# Altium PCB PCB1.PcbDoc (part 1 of 3)
Units mil, origin at the board's own origin, x right, y up, seen from the top; angles counter-clockwise.
Board outline 3150 x 1810 mil, 2 copper layers (Top Layer, Bottom Layer); 127 components, 76 nets, 410 pads, 265 vias.
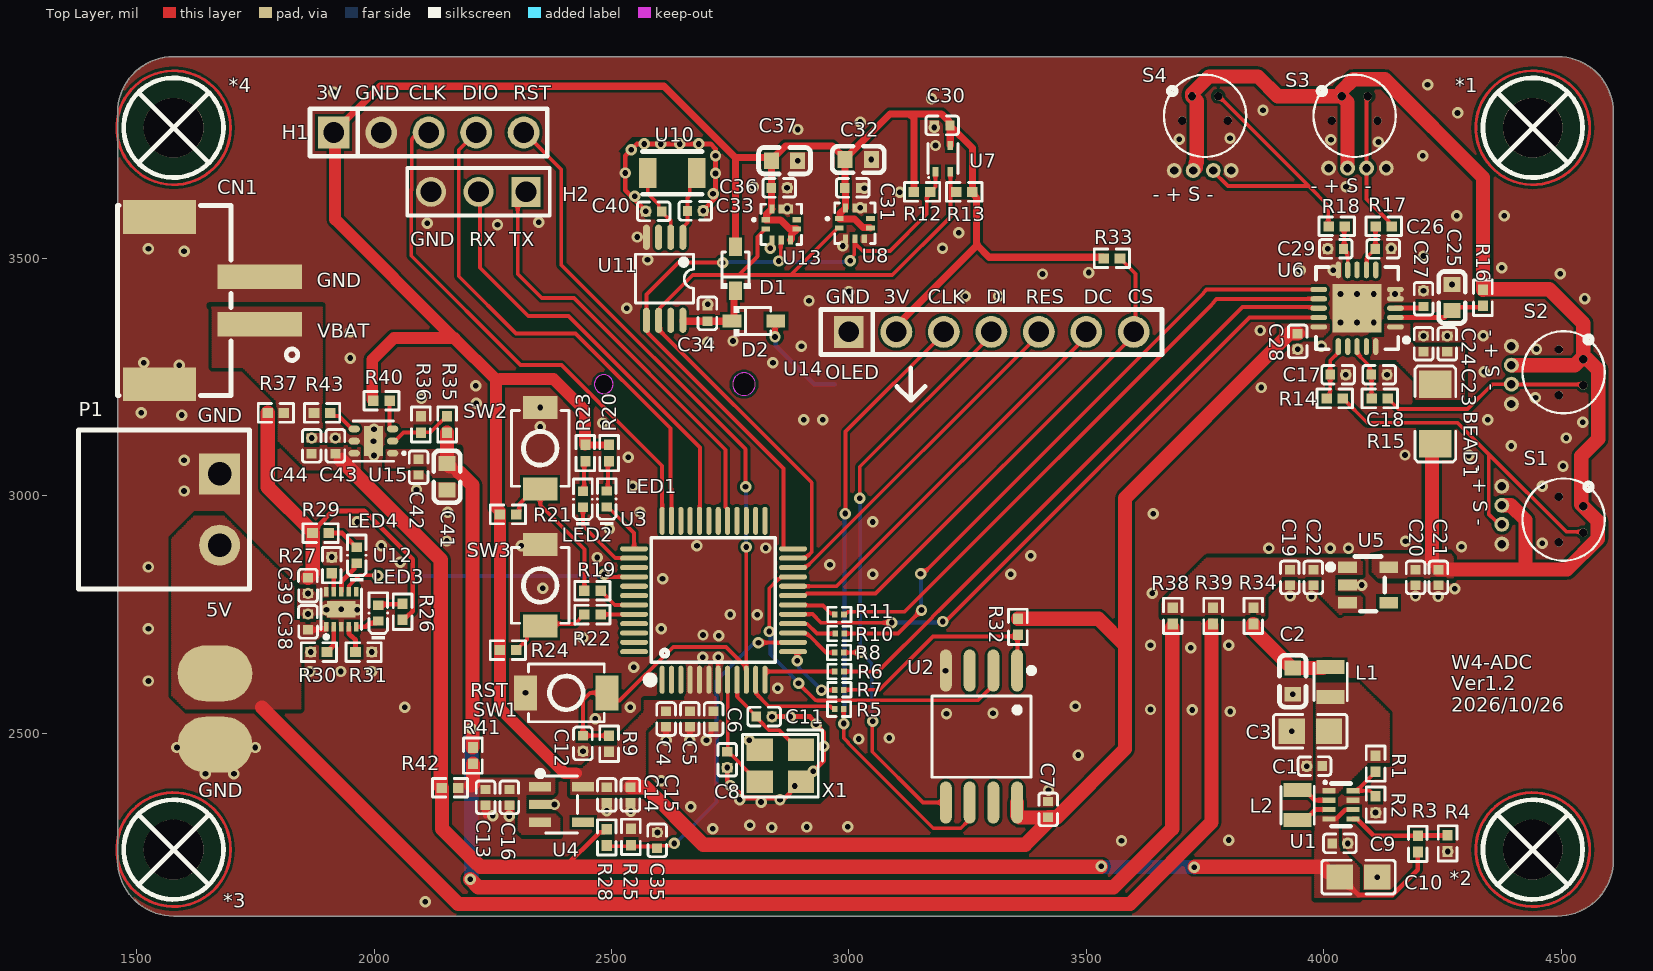
[diagram p0: Top Layer view]
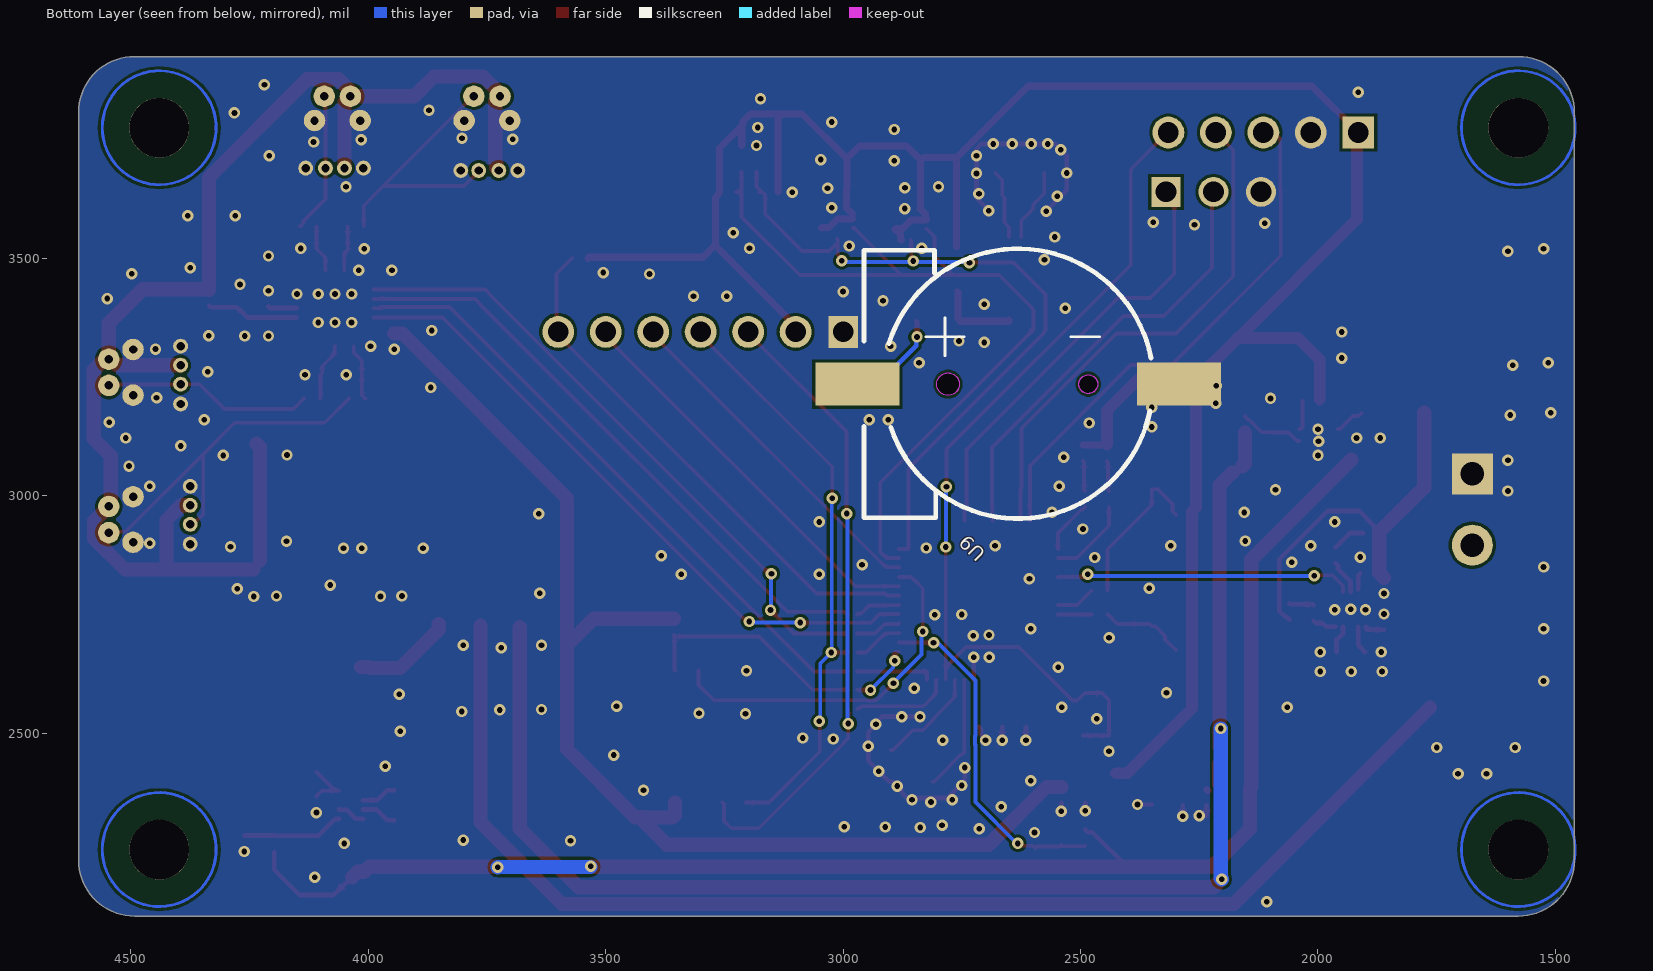
[diagram p1: Bottom Layer view, seen from below]

## Layer stack, top to bottom
Top Solder: solder mask 0.4, Solder Resist, Dk 3.5
Top Layer: signal copper 1.4
Dielectric 1: dielectric 12.6, FR-4, Dk 4.8
Bottom Layer: signal copper 1.4
Bottom Solder: solder mask 0.4, Solder Resist, Dk 3.5

## Board outline
1460,2233.11 1460,3806.89 cw(c1578.11,3806.89) 1578.11,3925 4491.89,3925 cw(c4491.89,3806.89) 4610,3806.89 4610,2233.11 cw(c4491.89,2233.11) 4491.89,2115 1578.11,2115 cw(c1578.11,2233.11)

## Design rules (kind name [scope] priority, off if disabled: settings)
Clearance [All] p1: gap=6 ignorepadtopadclearanceinfootprint=FALSE except(4: Arc-Arc Arc-Track Track-Track; 6.9: Arc-Hole Track-Hole SMDPad-Hole THPad-Hole Via-Hole Fill-Hole Poly-Hole Region-Hole Text-Hole; 10: Fill-Text Poly-Text Region-Text)
ComponentClearance [All] p1: gap=0 collisioncheckmode=3 verticalgap=0 showdistances=FALSE
HoleSize [All] p1: absolutevalues=TRUE maxlimit=130 minlimit=1 maxpercent=80.000 minpercent=20.000
MinimumSolderMaskSliver [All] p1: minsoldermaskwidth=3
PlaneConnect [All] p1: planeconnectstyle=Direct reliefexpansion=20 reliefentries=4 reliefconductorwidth=10 reliefairgap=10
PolygonConnect [All] p1: connectstyle=Direct reliefconductorwidth=10 reliefentries=4 polygonreliefangle="90 Angle" airgapwidth=10
RoutingVias [All] p1: holewidth=28 width=50 viastyle="Through Hole" minholewidth=28 minwidth=50 maxholewidth=28 maxwidth=50
SilkToSilkClearance [All] p1: silktosilkclearance=2
SilkToSolderMaskClearance [IsPad] p1: minsilkscreentomaskgap=2 clearancetoexposedcopper=TRUE
SolderMaskExpansion [All] p1: expansion=0 istentingtop=FALSE
SupplyNets "Schematic Supply Nets_5" [InNet('5.5V')] p1: voltage=0.000
SupplyNets "Schematic Supply Nets_2" [InNet('5V_BOOST')] p2: voltage=0.000
SupplyNets "Schematic Supply Nets_4" [InNet('5V_IN')] p3: voltage=0.000
SupplyNets "Schematic Supply Nets" [InNet('VBAT')] p4: voltage=0.000
SupplyNets "Schematic Supply Nets_3" [InNet('3V')] p5: voltage=0.000
SupplyNets "Schematic Supply Nets_1" [InNet('5V')] p6: voltage=0.000
SupplyNets "Schematic Supply Nets_8" [InNet('GND')] p7: voltage=0.000
Width [All] p1: maxlimit=50 minlimit=6 preferedwidth=10 minimp=50.000000 maximp=50.000000 favimp=50.000000
24 further rules are at their usual default settings.

## Components (designator, comment, footprint, x,y, rotation, side; value= is the part's Value field where it differs from the comment)
*1 "螺丝孔_1" M3螺丝 4440,3775 r0 top
*2 "螺丝孔_1" M3螺丝 4440,2255 r0 top
*3 "螺丝孔_1" M3螺丝 1578,2255 r0 top
*4 "螺丝孔_1" M3螺丝 1578,3775 r0 top
BEAD1 "cbm321609u000t" L1206 4235,3172.3 r90 top
C1 "cc0402krx7r7bb104" C0402 3980.43,2430.71 r180 top value=100nF
C2 "hgc0603r5225k500nthj" C0603 3934.72,2609.68 r90 top value=2.2uF
C3 "cga0805x5r226m250mt" C0805 3971.63,2504.15 r180 top value=22uF
C4 "cc0402krx7r7bb104" C0402 2615,2530 r270 top value=100nF
C5 "cc0402krx7r7bb104" C0402 2665,2530 r270 top value=100nF
C6 "cc0402krx7r7bb104" C0402 2715,2530 r270 top value=100nF
C7 "cc0402krx7r7bb104" C0402 3419.65,2339.64 r90 top value=100nF
C8 "cc0402jrnpo9bn180" C0402 2743.78,2444.2 r270 top value=18pF
C9 "cc0402krx7r7bb104" C0402 4034,2268 r180 top value=100nF
C10 "cl21a476mqynnne" C0805 4073,2197 r180 top value=47uF
C11 "cc0402jrnpo9bn180" C0402 2821.54,2535 r180 top value=18pF
C12 "cc0402krx7r7bb104" C0402 2440,2478.46 r90 top value=100nF
C13 "cga0402x5r105k500gt" C0402 2235,2365 r270 top value=1uF
C14 "cc0402krx7r7bb104" C0402 2490,2370 r270 top value=100nF
C15 "cga0402x5r105k500gt" C0402 2540,2370 r270 top value=1uF
C16 "cc0402krx7r7bb104" C0402 2285,2365 r270 top value=100nF
C17 "cc0402jrnpo9bn101" C0402 4030,3255 r0 top value=100pF
C18 "cc0402jrnpo9bn101" C0402 4116.54,3255 r0 top value=100pF
C19 "cga0402x5r105k500gt" C0402 3928.52,2827.99 r270 top value=1uF
C20 "cc0402krx7r7bb104" C0402 4193.31,2827.99 r270 top value=100nF
C21 "cga0402x5r105k500gt" C0402 4241.31,2827.99 r270 top value=1uF
C22 "cc0402krx7r7bb104" C0402 3978.01,2827.99 r270 top value=100nF
C23 "cga0402x5r105k500gt" C0402 4260,3320 r90 top value=1uF
C24 "cc0402krx7r7bb104" C0402 4210,3320 r90 top value=100nF
C25 "hgc0603r5106m350nthj" C0603 4270,3417.56 r90 top value=10uF
C26 "cc0402jrnpo9bn101" C0402 4125,3520 r0 top value=100pF
C27 "cc0402krx7r7bb104" C0402 4210,3415 r90 top value=100nF
C28 "cc0402krx7r7bb104" C0402 3945,3325 r90 top value=100nF
C29 "cc0402jrnpo9bn101" C0402 4025,3520 r180 top value=100pF
C30 "cc0402krx7r7bb104" C0402 3196.46,3780 r180 top value=100nF
C31 "cc0402krx7r7bb104" C0402 3007.94,3648.43 r0 top value=100nF
C32 "hgc0603r5106m350nthj" C0603 3019.68,3707.99 r0 top value=10uF
C33 "cga0402c0g120j500gt" C0402 2676.54,3600 r0 top value=12pF
C34 "cc0402krx7r7bb104" C0402 2702,3384 r90 top value=100nF
C35 "cc0402krx7r7bb104" C0402 2596.23,2274.46 r270 top value=100nF
C36 "cc0402krx7r7bb104" C0402 2853.27,3648.43 r0 top value=100nF
C37 "hgc0603r5106m350nthj" C0603 2864.53,3705.69 r0 top value=10uF
C38 "cga0402x5r105k500gt" C0402 1861,2734.58 r270 top value=1uF
C39 "cga0402x5r105k500gt" C0402 1861,2810.9 r90 top value=1uF
C40 "cga0402c0g120j500gt" C0402 2589,3599 r0 top value=12pF
C41 "hgc0603r5225k500nthj" C0603 2153.76,3040.17 r270 top value=2.2uF
C42 "cc0402krx7r7bb104" C0402 2093.76,3060.17 r270 top value=100nF
C43 "cc0402krx7r7bb104" C0402 1918.76,3105.17 r270 top value=100nF
C44 "cga0402x5r105k500gt" C0402 1868.76,3105.17 r270 top value=1uF
CN1 "2.54-2a-lt" CONN-SMD_2P-P2.54_XH2.54-2AB 1653.95,3411.23 r90 top
D1 "1n5819ws_c191023" SOD-323_L1.8-W1.3-LS2.5-RD 2761.32,3478.16 r90 top
D2 "1n5819ws_c191023" SOD-323_L1.8-W1.3-LS2.5-RD 2800,3368 r0 top
H1 "pz254v-11-05p" HDR-TH_5P-P2.54-V-M 2115,3765 r0 top
H2 "lail-pz2.54-3p-l" HDR-TH_3P-P2.54-V-M-1 2220,3640 r180 top
L1 "pct201210-1r0-m" IND-SMD_L2.0-W1.2_PCT201210 4014.5,2608 r270 top value=1uH
L2 "pct201210-1r0-m" IND-SMD_L2.0-W1.2_PCT201210 3945,2348.5 r90 top value=1uH
LED1 "xl-1005ugc_c965793" LED0402-RD_GREEN 2490,2993.27 r90 top
LED2 "xl-1005ugc_c965793" LED0402-RD_GREEN 2439.96,2992.76 r90 top
LED3 "xl-1005ugc_c965793" LED0402-RD_GREEN 2009,2753 r90 top
LED4 "xl-1005ugc_c965793" LED0402-RD_GREEN 1963.55,2874.73 r90 top
P1 "wj15edgrc-3.81-02p-14-00a" CONN-TH_2P-P3.81_WJ15EDGRC-3.81-2P 1675,2971 r270 top
R1 "0402wgf8663tce" R0402 4109,2436 r270 top value=866kΩ
R2 "rt0402brd0791kl" R0402 4109,2349.96 r270 top value=91kΩ
R3 "frc0402f0000ts" R0402 4198,2267 r90 top value=0Ω
R4 "frc0402f1003ts" R0402 4260.74,2268 r270 top value=100kΩ
R5 "0201wmf470jtee" R0201 2979.51,2550.86 r180 top value=47Ω
R6 "0201wmf470jtee" R0201 2980,2630 r180 top value=47Ω
R7 "0201wmf470jtee" R0201 2979.84,2591.48 r180 top value=47Ω
R8 "0201wmf470jtee" R0201 2979.51,2670 r180 top value=47Ω
R9 "frc0402f1002ts" R0402 2495,2477.96 r270 top value=10kΩ
R10 "0201wmf470jtee" R0201 2980.49,2710 r180 top value=47Ω
R11 "0201wmf470jtee" R0201 2980,2750 r180 top value=47Ω
R12 "rc0402fr-074k7l" R0402 3154,3640 r0 top value=4.7kΩ
R13 "rc0402fr-074k7l" R0402 3243,3640 r180 top value=4.7kΩ
R14 "frc0402f1000ts" R0402 4022.96,3205 r180 top value=100Ω
R15 "frc0402f1000ts" R0402 4117.96,3205 r180 top value=100Ω
R16 "frc0402f0000ts" R0402 4335,3417.04 r90 top value=0Ω
R17 "frc0402f1000ts" R0402 4126.31,3567.39 r180 top value=100Ω
R18 "frc0402f1000ts" R0402 4027.23,3567.39 r0 top value=100Ω
R19 "0402wgf4700tce" R0402 2460,2800 r0 top value=470Ω
R20 "frc0402j102 ts" R0402 2495,3090 r90 top value=1kΩ
R21 "rc0402fr-074k7l" R0402 2282.04,2960.67 r0 top value=4.7kΩ
R22 "0402wgf4700tce" R0402 2460,2750 r0 top value=470Ω
R23 "frc0402j102 ts" R0402 2445,3090 r90 top value=1kΩ
R24 "rc0402fr-074k7l" R0402 2282.04,2675 r0 top value=4.7kΩ
R25 "0402wgf4702tce" R0402 2541.06,2281.56 r270 top value=47kΩ
R26 "frc0402f1501ts" R0402 2060,2755.96 r270 top value=1.5kΩ
R27 "frc0402f1002ts" R0402 1911,2853.96 r90 top value=10kΩ
R28 "frc0402f1003ts" R0402 2490.04,2280.71 r90 top value=100kΩ
R29 "frc0402f1501ts" R0402 1887.47,2921.58 r180 top value=1.5kΩ
R30 "frc0402f5900ts" R0402 1883.96,2671 r0 top value=590Ω
R31 "frc0402f2001ts" R0402 1978.04,2671 r180 top value=2kΩ
R32 "frc0402f1002ts" R0402 3356,2724 r90 top value=10kΩ
R33 "frc0402f1002ts" R0402 3553.89,3500.06 r0 top value=10kΩ
R34 "frc0402f0000ts" R0402 3851.59,2747.04 r270 top value=0Ω
R35 "frc0402f3482ts" R0402 2153.76,3150.17 r270 top value=34.8kΩ
R36 "frc0402f1002ts" R0402 2098.76,3150.17 r270 top value=10kΩ
R37 "frc0402f0000ts" R0402 1793.32,3174.64 r0 top value=0Ω
R38 "frc0402f0000ts" R0402 3681.87,2747.04 r270 top value=0Ω
R39 "frc0402f0000ts" R0402 3766.73,2747.04 r270 top value=0Ω
R40 "frc0402f1002ts" R0402 2015.8,3200.17 r0 top value=10kΩ
R41 "frc0402f0000ts" R0402 2208.19,2452.97 r270 top value=0Ω
R42 "frc0402f0000ts" R0402 2160,2385 r0 top value=0Ω
R43 "frc0402f0000ts" R0402 1890.72,3174.64 r0 top value=0Ω
S1 "PressureSensor" PressureSensor 4505,2950 r270 top
S2 "PressureSensor" PressureSensor 4505,3260 r270 top
S3 "PressureSensor" PressureSensor 4065,3800 r0 top
S4 "PressureSensor" PressureSensor 3750,3800 r0 top
SW1 "ts-1088-ar02016" SW-SMD_L3.9-W3.0-P4.45 2405,2585 r0 top
SW2 "ts-1088-ar02016" SW-SMD_L3.9-W3.0-P4.45 2350,3100 r270 top
SW3 "ts-1088-ar02016" SW-SMD_L3.9-W3.0-P4.45 2350,2811.34 r270 top
U1 "tps631000drlr" SOT-583-8_L2.1-W1.2-P0.50-LS1.6-BL 4036.2,2349.16 r270 top
U2 "w25q128jvsiq" SOIC-8_L5.3-W5.3-P1.27-LS8.0-BL 3279.21,2493.06 r180 top
U3 "stm32g031c8t6" LQFP-48_L7.0-W7.0-P0.50-LS9.0-BL 2715,2780 r0 top
U4 "lp5907mfx-3.0/nopb" SOT-23-5_L3.0-W1.7-P0.95-LS2.8-BL 2395,2350 r270 top
U5 "tps7a2050pdbvr" SOT-23-5_L2.9-W1.6-P0.95-LS2.8-BR 4093.31,2811.99 r180 top
U6 "ad7682bcpz" LFCSP-20_L4.0-W4.0-P0.50-BL-EP 4070,3395 r90 top
U7 "sht41-ad1b-r2" DFN-4_L1.5-W1.5-SHT41-AD1B-R2 3198,3710 r90 top
U8 "lps22hbtr" HLGA-10L_LPS22HBTR 3012.61,3573.64 r0 top
U9 "xdcr-1220-006" BAT-SMD_CR1220-2ZX 2631.42,3235 r180 bottom
U10 "fc31m2-32.768-ntlnndtl" CRYSTAL-SMD_L3.2-W1.5 2628,3680 r0 top value=32.768kHz
U11 "pcf8563ts/5,118" TSSOP-8_L3.0-W3.0-P0.65-LS4.9-BL 2612,3457 r180 top
U12 "bq24040dsqr" WSON-10_L2.0-W2.0-P0.40-BL-EP 1931,2761 r0 top
U13 "lps22hbtr" HLGA-10L_LPS22HBTR 2857.46,3571.34 r0 top
U14 "kh-2.54fh-1x7p-h8.5" HDR-TH_7P-P2.54-V-F 3300,3345 r0 top
U15 "tps7a2501drvr" WSON-6_L2.0-W2.0-P0.65-TL-EP 1998.76,3115.17 r180 top
X1 "x32258mob4si" CRYSTAL-SMD_4P-L3.2-W2.5-BL 2855.61,2431.46 r180 top value=8MHz

## Footprints (in the part's own frame and the unit in brackets; to place one, negate y for a bottom-side part, rotate by r counter-clockwise, add the part's x,y. Pads: shape width x height; smd on the part's side, far side on the other; paste and mask are expansions set on the pad)
BAT-SMD_CR1220-2ZX [mm]
  rect 4.5x2.3 smd: 1(-8.6,0) 2(8.6,0)
  Keep-Out Layer board cut-out: 4.25,0 4.25,-0.099 4.174,-0.283 4.033,-0.424 3.85,-0.5 3.651,-0.5 3.467,-0.424 3.326,-0.283 3.25,-0.099 3.25,0 3.25,0.099 3.326,0.283 3.467,0.424 3.651,0.5 3.85,0.5 4.033,0.424 4.174,0.283 4.25,0.099 4.25,0 4.25,0
  Keep-Out Layer board cut-out: -3.15,0 -3.15,-0.119 -3.241,-0.34 -3.41,-0.509 -3.631,-0.6 -3.869,-0.6 -4.09,-0.509 -4.259,-0.34 -4.35,-0.119 -4.35,0 -4.35,0.119 -4.259,0.34 -4.09,0.509 -3.869,0.6 -3.631,0.6 -3.41,0.509 -3.241,0.34 -3.15,0.119 -3.15,0 -3.15,0
  Keep-Out Layer circle w0.003: c3.75,0 r0.5
  Keep-Out Layer circle w0.003: c-3.75,0 r0.6
  Keep-Out Layer region: 4.25,0 4.25,-0.099 4.174,-0.283 4.033,-0.424 3.85,-0.5 3.651,-0.5 3.467,-0.424 3.326,-0.283 3.25,-0.099 3.25,0 3.25,0.099 3.326,0.283 3.467,0.424 3.651,0.5 3.85,0.5 4.033,0.424 4.174,0.283 4.25,0.099 4.25,0 4.25,0
  Keep-Out Layer region: 4.25,0 4.24,-0.098 4.212,-0.191 4.166,-0.278 4.104,-0.354 4.028,-0.416 3.941,-0.462 3.848,-0.49 3.75,-0.5 3.653,-0.49 3.559,-0.462 3.472,-0.416 3.397,-0.354 3.334,-0.278 3.288,-0.191 3.26,-0.098 3.25,0 3.26,0.098 3.288,0.191 3.334,0.278 3.397,0.354 3.472,0.416 3.559,0.462 3.653,0.49 3.75,0.5 3.848,0.49 3.941,0.462 4.028,0.416 4.104,0.354 4.166,0.278 4.212,0.191 4.24,0.098 4.25,0
  Keep-Out Layer region: -3.15,0 -3.15,-0.119 -3.241,-0.34 -3.41,-0.509 -3.631,-0.6 -3.869,-0.6 -4.09,-0.509 -4.259,-0.34 -4.35,-0.119 -4.35,0 -4.35,0.119 -4.259,0.34 -4.09,0.509 -3.869,0.6 -3.631,0.6 -3.41,0.509 -3.241,0.34 -3.15,0.119 -3.15,0 -3.15,0
  Keep-Out Layer region: -3.15,0 -3.159,-0.104 -3.186,-0.205 -3.23,-0.3 -3.29,-0.386 -3.364,-0.46 -3.45,-0.52 -3.545,-0.564 -3.646,-0.591 -3.75,-0.6 -3.854,-0.591 -3.955,-0.564 -4.05,-0.52 -4.136,-0.46 -4.21,-0.386 -4.27,-0.3 -4.314,-0.205 -4.341,-0.104 -4.35,0 -4.341,0.104 -4.314,0.205 -4.27,0.3 -4.21,0.386 -4.136,0.46 -4.05,0.52 -3.955,0.564 -3.854,0.591 -3.75,0.6 -3.646,0.591 -3.545,0.564 -3.45,0.52 -3.364,0.46 -3.29,0.386 -3.23,0.3 -3.186,0.205 -3.159,0.104 -3.15,0
  silkscreen extent -8.24,-7.19 7.11,7.24
C0402 [mm]
  rect 0.5x0.54 smd: 1(-0.42,0) 2(0.42,0)
  silkscreen extent -0.87,-0.5 0.87,0.5
C0603 [mm]
  rect 0.8x0.9 smd: 1(-0.7,0) 2(0.7,0)
  silkscreen extent -1.39,-0.71 1.39,0.71
C0805 [mm]
  rect 1.41x1.35 smd paste-100 mask+0.051: 1(-1,0) 2(1,0)
  silkscreen extent -1.96,-0.9 1.96,0.9
CONN-SMD_2P-P2.54_XH2.54-2AB [mm]
  rect 1.3x4.5 smd: 1(-1.269,-2.675) 2(1.27,-2.675)
  rect 1.8x3.9 smd: 3(-4.47,2.675) 4(4.47,2.675)
  silkscreen extent -5.08,-4.71 5.08,4.93
CONN-TH_2P-P3.81_WJ15EDGRC-3.81-2P [mm]
  rect 2.2x2.2 hole 1.26: 1(-1.905,0)
  round 2.2 hole 1.26: 2(1.905,0)
  silkscreen extent -4.25,-7.55 4.25,1.6
CRYSTAL-SMD_4P-L3.2-W2.5-BL [mm]
  rect 1.4x1.2 smd: 1(-1.1,-0.85) 2(1.1,-0.85) 3(1.1,0.85) 4(-1.1,0.85)
  silkscreen extent -2.26,-1.91 2.03,1.68
CRYSTAL-SMD_L3.2-W1.5 [mm]
  rect 0.95x1.6 smd: 1(-1.308,0) 2(1.308,0)
  silkscreen extent -1.6,-1.14 1.6,1.14
DFN-4_L1.5-W1.5-SHT41-AD1B-R2 [mm]
  rect 0.5x0.3 smd paste+0 mask+0.051: 1(-0.7,0.4) 2(-0.7,-0.4) 3(0.7,-0.4) 4(0.7,0.4)
  silkscreen extent -1.05,-0.8 0.8,0.8
HDR-TH_3P-P2.54-V-M-1 [mm]
  rect 1.575x1.6 hole 1.1 paste-2539.97 mask+0.05: 1(-2.54,0)
  round 1.6 hole 1.1 paste-2539.97 mask+0.05: 2(0,0) 3(2.54,0)
  silkscreen extent -3.81,-1.27 3.81,1.27
HDR-TH_5P-P2.54-V-M [mm]
  rect 1.7x1.7 hole 1.1: 1(-5.08,0)
  round 1.7 hole 1.1: 2(-2.54,0) 3(0,0) 4(2.54,0) 5(5.08,0)
  silkscreen extent -6.35,-1.27 6.35,1.27
HDR-TH_7P-P2.54-V-F [mm]
  rect 1.575x1.7 hole 1.1: 1(-7.62,0)
  round 1.7 hole 1.1: 2(-5.08,0) 3(-2.54,0) 4(0,0) 5(2.54,0) 6(5.08,0) 7(7.62,0)
  silkscreen extent -9.13,-1.2 9.13,1.2
HLGA-10L_LPS22HBTR [mm]
  rect 0.465x0.28 smd: 1(-0.832,0.255) 2(-0.832,-0.245) 6(0.832,-0.245) 7(0.832,0.255)
  rect 0.28x0.465 smd: 3(-0.5,-0.827) 4(0,-0.827) 5(0.5,-0.827) 8(0.5,0.827) 9(0,0.827) 10(-0.5,0.827)
  silkscreen extent -1.54,-1.07 1.08,1.08
IND-SMD_L2.0-W1.2_PCT201210 [mm]
  rect 0.75x1.5 smd: 1(-0.8,0) 2(0.8,0)
  silkscreen extent -1,-0.89 1,0.89
L1206 [mm]
  rect 1.485x1.728 smd paste-100 mask+0.051: 1(-1.593,0) 2(1.593,0)
  silkscreen extent -2.56,-1.09 2.56,1.09
LED0402-RD_GREEN [mm]
  rect 0.5x0.54 smd paste+0 mask+0.051: 1(-0.425,0) 2(0.425,0)
  silkscreen extent -1.39,-0.54 1.09,0.54
LFCSP-20_L4.0-W4.0-P0.50-BL-EP [mm]
  oval 0.28x0.9 smd paste-100 mask+0.051: 1(-1,-2.05) 2(-0.5,-2.05) 3(0,-2.05) 4(0.5,-2.05) 5(1,-2.05) 11(1,2.05) 12(0.5,2.05) 13(0,2.05) 14(-0.5,2.05) 15(-1,2.05)
  oval 0.9x0.28 smd paste-100 mask+0.051: 6(2.05,-1) 7(2.05,-0.5) 8(2.05,0) 9(2.05,0.5) 10(2.05,1) 16(-2.05,1) 17(-2.05,0.5) 18(-2.05,0) 19(-2.05,-0.5) 20(-2.05,-1)
  rect 2.6x2.6 smd paste-100 mask+0.051: 21(0,0)
  silkscreen extent -2.2,-2.77 2.2,2.2
LQFP-48_L7.0-W7.0-P0.50-LS9.0-BL [mm]
  oval 0.27x1.5 smd paste+0 mask+0.05: 1(-2.75,-4.25) 2(-2.25,-4.25) 3(-1.75,-4.25) 4(-1.25,-4.25) 5(-0.75,-4.25) 6(-0.25,-4.25) 7(0.25,-4.25) 8(0.75,-4.25) 9(1.25,-4.25) 10(1.75,-4.25) 11(2.25,-4.25) 12(2.75,-4.25) 25(2.75,4.25) 26(2.25,4.25) 27(1.75,4.25) 28(1.25,4.25) 29(0.75,4.25) 30(0.25,4.25) 31(-0.25,4.25) 32(-0.75,4.25) 33(-1.25,4.25) 34(-1.75,4.25) 35(-2.25,4.25) 36(-2.75,4.25)
  oval 1.5x0.27 smd paste+0 mask+0.05: 13(4.25,-2.75) 14(4.25,-2.25) 15(4.25,-1.75) 16(4.25,-1.25) 17(4.25,-0.75) 18(4.25,-0.25) 19(4.25,0.25) 20(4.25,0.75) 21(4.25,1.25) 22(4.25,1.75) 23(4.25,2.25) 24(4.25,2.75) 37(-4.25,2.75) 38(-4.25,2.25) 39(-4.25,1.75) 40(-4.25,1.25) 41(-4.25,0.75) 42(-4.25,0.25) 43(-4.25,-0.25) 44(-4.25,-0.75) 45(-4.25,-1.25) 46(-4.25,-1.75) 47(-4.25,-2.25) 48(-4.25,-2.75)
  silkscreen extent -3.59,-4.46 3.3,3.34
M3螺丝 [mil]
  round 126 hole 126 paste-99999 mask+4: 1(0,0)
  silkscreen extent -105,-105 105,105
PressureSensor [mm]
  round 0.45 / inner round 1.15 / far side round 1.15 hole 0.45: 1(-0.7,1.05) 2(-1.22,-0.25) 3(1.22,-0.25) 4(0.7,1.05)
  silkscreen extent -2.2,-2.2 2.2,2.2
R0201 [mil]
  rect 11.93x12.76 smd paste-3937.01 mask+2: 1(-9.51,0) 2(9.51,0)
  silkscreen extent -24,-15 24,15
R0402 [mm]
  rect 0.566x0.54 smd paste-100 mask+0.051: 1(-0.433,0) 2(0.433,0)
  silkscreen extent -0.94,-0.5 0.94,0.5
SOD-323_L1.8-W1.3-LS2.5-RD [mm]
  rect 1x0.7 smd: 1(-1.172,0) 2(1.172,0)
  silkscreen extent -1.08,-0.8 0.9,0.8
SOIC-8_L5.3-W5.3-P1.27-LS8.0-BL [mm]
  oval 0.63x2.25 smd: 1(-1.905,-3.53) 2(-0.635,-3.53) 3(0.635,-3.53) 4(1.905,-3.53) 5(1.905,3.53) 6(0.635,3.53) 7(-0.635,3.53) 8(-1.905,3.53)
  silkscreen extent -2.82,-3.68 2.64,2.18
SOT-23-5_L2.9-W1.6-P0.95-LS2.8-BR [mm]
  rect 1x0.6 smd paste+0 mask+0.05: 1(1.1,-0.95) 2(1.1,0) 3(1.1,0.95) 4(-1.1,0.95) 5(-1.1,-0.95)
  silkscreen extent -0.89,-1.52 2.16,1.4
SOT-23-5_L3.0-W1.7-P0.95-LS2.8-BL [mm]
  rect 0.49x1.157 smd: 1(-0.95,-1.154) 2(0,-1.154) 3(0.95,-1.154)
  rect 0.49x1.175 smd: 4(0.95,1.154) 5(-0.95,1.154)
  silkscreen extent -1.8,-1.29 1.53,0.85
SOT-583-8_L2.1-W1.2-P0.50-LS1.6-BL [mm]
  rect 0.28x0.68 smd: 1(-0.75,-0.64) 2(-0.25,-0.64) 3(0.25,-0.64) 4(0.75,-0.64) 5(0.75,0.64) 6(0.25,0.64) 7(-0.25,0.64) 8(-0.75,0.64)
  silkscreen extent -1.27,-0.92 1.14,0.51
SW-SMD_L3.9-W3.0-P4.45 [mm]
  rect 1.23x1.86 smd: 1(-2.185,0) 2(2.185,0)
  silkscreen extent -2.03,-1.54 2.03,1.54
TSSOP-8_L3.0-W3.0-P0.65-LS4.9-BL [mm]
  oval 0.37x1.35 smd: 1(-0.975,-2.22) 2(-0.325,-2.22) 3(0.325,-2.22) 4(0.975,-2.22) 5(0.975,2.22) 6(0.325,2.22) 7(-0.325,2.22) 8(-0.975,2.22)
  silkscreen extent -1.55,-1.31 1.55,1.3
WSON-6_L2.0-W2.0-P0.65-TL-EP [mm]
  oval 0.607x0.364 smd: 1(-1.028,0.65) 2(-1.028,0) 3(-1.028,-0.65) 4(1.028,-0.65) 5(1.028,0) 6(1.028,0.65)
  rect 1x1.6 smd: 7(0,0)
  silkscreen extent -1.71,-1.08 1.08,1.08
WSON-10_L2.0-W2.0-P0.40-BL-EP [mm]
  rect 0.224x0.505 smd: 1(-0.8,-0.928) 2(-0.4,-0.928) 3(0,-0.928) 4(0.4,-0.928) 5(0.8,-0.928) 6(0.8,0.928) 7(0.4,0.928) 8(0,0.928) 9(-0.4,0.928) 10(-0.8,0.928)
  rect 1.5x0.9 smd: 11(0,0)
  silkscreen extent -1.08,-1.58 1.08,1.08

## Part data
BEAD1: "阻抗@频率:0Ω@100MHz;直流电阻(DCR):10mΩ;", Current Rating=6A, DC Resistance(DCR)=10mΩ, Impedance @ Frequency=0Ω@100MHz, JLCPCB Part Class="Extended Part", LCSC Part Name="单路 1206磁珠 阻抗0Ω@100MHz", Manufacturer=FH(风华), ManufacturerPart=CBM321609U000T, Operating Temperature=-55℃~+125℃, AddInBom=yes, ConvertToPcb=yes, Datasheet=https://item.szlcsc.com/datasheet/CBM321609U000T/367610.html, FootprintName=L1206, ModelId=85bdab7b3d4c4074b81d208eb5e865b3, ModelName=L1206_L3.2-W1.6-H1.1, ModelTransform=125.984,62.835,0,0,0,0,0,0,0, Number of Circuits=1, Supplier=LCSC, Supplier Footprint=1206, SupplierPart=C391206, Symbol=CBM321609U000T
C1 C4 C5 C6 C7 C9 C12 C14 C16 C20 C22 C24 C27 C28 C30 C31 C34 C35 C36 C42 C43: "容值:100nF;精度:±10%;额定电压:16V;温度系数:X7R;", JLCPCB Part Class="Extended Part", LCSC Part Name="100nF ±10% 16V", Manufacturer=YAGEO(国巨), ManufacturerPart=CC0402KRX7R7BB104, Temperature Coefficient=X7R, Tolerance=±10%, Voltage Rating=16V, AddInBom=yes, ConvertToPcb=yes, Datasheet=https://item.szlcsc.com/datasheet/CC0402KRX7R7BB104/61526.html, FootprintName=C0402, ModelId=36a51122f27c49738f86b3bfa98863e0, ModelName=C0402_L1.0-W0.5-H0.5, ModelTransform=39.37,19.685,0,0,0,0,0,0,0, Supplier=LCSC, Supplier Footprint=0402, SupplierPart=C60474, Symbol=CC0402KRX7R7BB104
C2 C41: "容值:2.2uF;精度:±10%;额定电压:50V;温度系数:X5R;", JLCPCB Part Class="Extended Part", LCSC Part Name="2.2uF ±10% 50V", Manufacturer=Chinocera(华瓷), ManufacturerPart=HGC0603R5225K500NTHJ, Temperature Coefficient=X5R, Tolerance=±10%, Voltage Rating=50V, AddInBom=yes, ConvertToPcb=yes, Datasheet=https://item.szlcsc.com/datasheet/HGC0603R5225K500NTHJ/8438251.html, FootprintName=C0603, ModelId=ac125912035d415993ca9572d50418b1, ModelName=C0603_L1.6-W0.8-H0.8, ModelTransform=62.992,31.496,0,0,0,0,0,0,0, Supplier=LCSC, Supplier Footprint=0603, SupplierPart=C7432769, Symbol=HGC0603R5225K500NTHJ
C3: "容值:22uF;精度:±20%;额定电压:25V;温度系数:X5R;", JLCPCB Part Class="Extended Part", LCSC Part Name="22uF ±20% 25V", Manufacturer=HRE(芯声), ManufacturerPart=CGA0805X5R226M250MT, Temperature Coefficient=X5R, Tolerance=±20%, Voltage Rating=25V, AddInBom=yes, ConvertToPcb=yes, Datasheet=https://item.szlcsc.com/datasheet/CGA0805X5R226M250MT/7062605.html, FootprintName=C0805, ModelId=1ba041120af144c991958decab20d241, ModelName=C0805_L2.0-W1.3-H1.3, ModelTransform=78.74,51.181,0,0,0,0,0,0.0005,0, Supplier=LCSC, Supplier Footprint=0805, SupplierPart=C6119899, Symbol=CGA0805X5R226M250MT
C8 C11: "容值:18pF;精度:±5%;额定电压:50V;温度系数:NP0;", JLCPCB Part Class="Extended Part", LCSC Part Name="18pF ±5% 50V", Manufacturer=YAGEO(国巨), ManufacturerPart=CC0402JRNPO9BN180, Temperature Coefficient=NP0, Tolerance=±5%, Voltage Rating=50V, AddInBom=yes, ConvertToPcb=yes, Datasheet=https://item.szlcsc.com/datasheet/CC0402JRNPO9BN180/107417.html, FootprintName=C0402, ModelId=36a51122f27c49738f86b3bfa98863e0, ModelName=C0402_L1.0-W0.5-H0.5, ModelTransform=39.37,19.685,0,0,0,0,0,0,0, Supplier=LCSC, Supplier Footprint=0402, SupplierPart=C106202, Symbol=CC0402JRNPO9BN180
C10: "容值:47uF;精度:±20%;额定电压:6.3V;温度系数:X5R;", JLCPCB Part Class="Basic Part", LCSC Part Name="47uF ±20% 6.3V", Manufacturer=SAMSUNG(三星), ManufacturerPart=CL21A476MQYNNNE, Temperature Coefficient=X5R, Tolerance=±20%, Voltage Rating=6.3V, AddInBom=yes, ConvertToPcb=yes, Datasheet=https://item.szlcsc.com/datasheet/CL21A476MQYNNNE/17464.html, FootprintName=C0805, ModelId=1ba041120af144c991958decab20d241, ModelName=C0805_L2.0-W1.3-H1.3, ModelTransform=78.74,51.181,0,0,0,0,0,0.0005,0, Supplier=LCSC, Supplier Footprint=0805, SupplierPart=C16780, Symbol=CL21A476MQYNNNE
C13 C15 C19 C21 C23 C38 C39 C44: "容值:1uF;精度:±10%;额定电压:50V;温度系数:X5R;", JLCPCB Part Class="Extended Part", LCSC Part Name="1uF ±10% 50V", Manufacturer=HRE(芯声), ManufacturerPart=CGA0402X5R105K500GT, Temperature Coefficient=X5R, Tolerance=±10%, Voltage Rating=50V, AddInBom=yes, ConvertToPcb=yes, Datasheet=https://item.szlcsc.com/datasheet/CGA0402X5R105K500GT/7062517.html, FootprintName=C0402, ModelId=36a51122f27c49738f86b3bfa98863e0, ModelName=C0402_L1.0-W0.5-H0.5, ModelTransform=39.37,19.685,0,0,0,0,0,0,0, Supplier=LCSC, Supplier Footprint=0402, SupplierPart=C6119811, Symbol=CGA0402X5R105K500GT
C17 C18 C26 C29: "容值:100pF;精度:±5%;额定电压:50V;温度系数:NP0;", JLCPCB Part Class="Extended Part", LCSC Part Name="100pF ±5% 50V", Manufacturer=YAGEO(国巨), ManufacturerPart=CC0402JRNPO9BN101, Temperature Coefficient=NP0, Tolerance=±5%, Voltage Rating=50V, AddInBom=yes, ConvertToPcb=yes, Datasheet=https://item.szlcsc.com/datasheet/CC0402JRNPO9BN101/107415.html, FootprintName=C0402, ModelId=36a51122f27c49738f86b3bfa98863e0, ModelName=C0402_L1.0-W0.5-H0.5, ModelTransform=39.37,19.685,0,0,0,0,0,0,0, Supplier=LCSC, Supplier Footprint=0402, SupplierPart=C106200, Symbol=CC0402JRNPO9BN101
C25 C32 C37: "容值:10uF;精度:±20%;额定电压:35V;温度系数:X5R;", JLCPCB Part Class="Extended Part", LCSC Part Name="10uF ±20% 35V", Manufacturer=Chinocera(华瓷), ManufacturerPart=HGC0603R5106M350NTHJ, Temperature Coefficient=X5R, Tolerance=±20%, Voltage Rating=35V, AddInBom=yes, ConvertToPcb=yes, Datasheet=https://item.szlcsc.com/datasheet/HGC0603R5106M350NTHJ/23841132.html, FootprintName=C0603, ModelId=ac125912035d415993ca9572d50418b1, ModelName=C0603_L1.6-W0.8-H0.8, ModelTransform=62.992,31.496,0,0,0,0,0,0,0, Supplier=LCSC, Supplier Footprint=0603, SupplierPart=C22367827, Symbol=HGC0603R5106M350NTHJ
C33 C40: "容值:12pF;精度:±5%;额定电压:50V;温度系数:C0G;", JLCPCB Part Class="Extended Part", LCSC Part Name="12pF ±5% 50V 停产", Manufacturer=HRE(芯声), ManufacturerPart=CGA0402C0G120J500GT, Temperature Coefficient=C0G, Tolerance=±5%, Voltage Rating=50V, AddInBom=yes, ConvertToPcb=yes, Datasheet=https://item.szlcsc.com/datasheet/CGA0402C0G120J500GT/47452244.html, FootprintName=C0402, ModelId=36a51122f27c49738f86b3bfa98863e0, ModelName=C0402_L1.0-W0.5-H0.5, ModelTransform=39.37,19.685,0,0,0,0,0,0,0, Supplier=LCSC, Supplier Footprint=0402, SupplierPart=C45359894, Symbol=CGA0402C0G120J500GT
CN1: "插针结构:1x2P;间距:2.54mm;安装方式:立贴;参考系列:XH;总PIN数:2P;排数:1;每排PIN数:2;行距:-;额定电流:500mA;触头材质:磷铜;触头镀层:锡;工作温度:-25℃~+85℃;", Color=米色, Current Rating=500mA, JLCPCB Part Class="Extended Part", LCSC Part Name="1x2P 间距:2.54mm 立贴 系列:XH", Manufacturer=CAX(创都), ManufacturerPart=2.54-2A-LT, Operating Temperature=-25℃~+85℃, Voltage Rating=50V, AddInBom=yes, Contact Material=磷铜, Contact Plating=锡, ConvertToPcb=yes, Datasheet=https://item.szlcsc.com/datasheet/2.54-2A-LT/766902.html, FootprintName=CONN-SMD_2P-P2.54_XH2.54-2AB, ModelId=d8a33bf5c0154e0995c08ba39c3c8f35, ModelName=CONN-SMD_XH2.54-LS-2P, ModelTransform=393.7,354.33,0,0,0,0,0,9.843,0, Mounting Type=立贴, Number of Pins=2P, Number of PINs Per Row=2, Number of Rows=1, Pins Structure=1x2P, Pitch=2.54mm, Plastic Material=LCP, Reference Series=XH, Row Spacing=-, Supplier=LCSC, Supplier Footprint=SMD,P=2.54mm, SupplierPart=C722695, Symbol=2.54-2A-LT, Y-Width of Bottom Edge on Board=6mm, Z-Height of the Board=7.9mm
D1 D2: "正向压降(Vf):600mV@1A;直流反向耐压(Vr):40V;整流电流:1A;", Current - Rectified=1A, JLCPCB Part Class="Basic Part", LCSC Part Name="电压:40V 电流:1A", Manufacturer=Hottech(合科泰), ManufacturerPart=1N5819WS, Non-Repetitive Peak Forward Surge Current=25A, Voltage - DC Reverse(Vr)=40V, Voltage - Forward(Vf@If)=600mV@1A, AddInBom=yes, ConvertToPcb=yes, Datasheet=https://item.szlcsc.com/datasheet/1N5819WS/213850.html, FootprintName=SOD-323_L1.8-W1.3-LS2.5-RD, ModelId=db63db13d9e342eb939127d413d6200b, ModelName=SOD-323_L1.8-W1.3-LS2.5-RD, ModelTransform=104.3305,51.181,0,0,0,0,0,-0.004,0, Supplier=LCSC, Supplier Footprint=SOD-323, SupplierPart=C191023, Symbol=1N5819WS
H1: "插针结构:1x5P;间距:2.54mm;行距:-;圆针/方针:方针;安装方式:直插;排数:单排;总PIN位数:5P;额定电流:3A;额定电压:250V;配合针长度:6mm;塑高:2.5mm;端接针长度:3mm;触头材质:黄铜;触头镀层:-;工作温度:-40℃~+105℃;颜色:黑色;", Color=黑色, Current Rating=3A, JLCPCB Part Class="Extended Part", LCSC Part Name="1x5P 间距:2.54mm 方针 直插", Manufacturer=XFCN(兴飞), ManufacturerPart=PZ254V-11-05P, Operating Temperature=-40℃~+105℃, Voltage Rating (Max)=250V, AddInBom=yes, Circluar Pins/Square Pins=方针, Contact Material=黄铜, Contact Plating=-, ConvertToPcb=yes, Datasheet=https://item.szlcsc.com/datasheet/PZ254V-11-05P/502960.html, FootprintName=HDR-TH_5P-P2.54-V-M, Insulation Height=2.5mm, Length of End Connection Pin=3mm, Length of Mating Pin=6mm, ModelId=47d466e4a34f4fc5bc626cf773a24dd5, ModelName=HDR-TH_5P-P2.54-M-LI-1X5P, ModelTransform=499.999,100,0,0,0,0,0,0,-118.11, Mounting Type=直插, Number of Pins=5P, Number of Rows=单排, Pin Structure=1x5P, Pitch=2.54mm, Row Spacing=-, Supplier=LCSC, Supplier Footprint=插件,P=2.54mm, SupplierPart=C492404, Symbol=PZ254V-11-05P
H2: "插针结构:1x3P;间距:2.54mm;圆针/方针:方针;排数:单排;总PIN位数:3P;额定电流:3A;额定电压:250V;塑高:2.5mm;端接针长度:3mm;触头材质:黄铜;触头镀层:金;工作温度:-25℃~+80℃;颜色:黑色;", Color=黑色, Current Rating=3A, JLCPCB Part Class="Extended Part", LCSC Part Name="1x3P 间距:2.54mm 方针", Manufacturer=LAILAN(莱联), ManufacturerPart=LAIL-PZ2.54-3P-L, Operating Temperature=-25℃~+80℃, Voltage Rating (Max)=250V, AddInBom=yes, Circluar Pins/Square Pins=方针, Contact Material=黄铜, Contact Plating=金, ConvertToPcb=yes, Datasheet=https://item.szlcsc.com/datasheet/LAIL-PZ2.54-3P-L/58519957.html, FootprintName=HDR-TH_3P-P2.54-V-M-1, Insulation Height=2.5mm, Length of End Connection Pin=3mm, ModelId=94a8ffe137b6410295cb18cd3ffd99db, ModelName=HDR-M-2.54_1x3, ModelTransform=299.9994,100,0,0,0,0,0,0,-118.11, Number of Pins=3P, Number of Rows=单排, Pin Structure=1x3P, Pitch=2.54mm, Supplier=LCSC, Supplier Footprint=插件,P=2.54mm, SupplierPart=C54950604, SymbolName=LAIL-PZ2.54-3P-L
L1 L2: "小型化一体成型T-CORE，小体积，扁线工艺，感值小", Current - Saturation(Isat)=3.3A, Current Rating=3A, DC Resistance(DCR)=80mΩ, JLCPCB Part Class="Extended Part", LCSC Part Name="1μH ±20% 3.3A", Manufacturer=JIERR(捷而瑞), ManufacturerPart=PCT201210-1R0-M, Tolerance=±20%, AddInBom=yes, ConvertToPcb=yes, Datasheet=https://item.szlcsc.com/datasheet/PCT201210-1R0-M/57921657.html, FootprintName=IND-SMD_L2.0-W1.2_PCT201210, Supplier=LCSC, Supplier Footprint=0805, SupplierPart=C54557069, Symbol=PCT201210-1R0-M, Type=一体成型电感
LED1 LED2 LED3 LED4: "灯头类型:1.0mmx0.5mm方形灯头;发光颜色:翠绿色;正向压降(Vf):3V;功率:80mW;正向电流:25mA;波长:516nm~531nm;二极管配置:独立二极管;透镜颜色:无色透明透镜;色温:-;发光强度:249mcd;发光角度:120°;载带方式:正贴;工作温度:-40℃~+85℃;", Color Temperature=-, Forward Current=25mA, Illumination Color=翠绿色, JLCPCB Part Class="Extended Part", LCSC Part Name=0402翠绿贴片式发光二极管, Lens Color=无色透明透镜, Manufacturer=XINGLIGHT(成兴光), ManufacturerPart=XL-1005UGC, Operating Temperature=-40℃~+85℃, Power(Watts)=80mW, Voltage - Forward(Vf)=3V, AddInBom=yes, ConvertToPcb=yes, Datasheet=https://item.szlcsc.com/datasheet/XL-1005UGC/1051402.html, Diode Configuration=独立二极管, FootprintName=LED0402-RD_GREEN, Lamp Holder Type=1.0mmx0.5mm方形灯头, Luminous Intensity=249mcd, ModelId=080bb9bd520f4b34ac21e218e7b036d6, ModelName=LED0402_L1.0-W0.5-H0.2, ModelTransform=40.1574,19.685,0,0,0,0,0,-0.0005,0, Mounting Style=正贴, Peak Wavelength=531nm, Supplier=LCSC, Supplier Footprint=0402, SupplierPart=C965793, Symbol=XL-1005UGC, Viewing Angle=120°, Wavelength - Dominant=516nm~531nm
P1: "连接器类型:板端/插座-闭口;固定方式:无固定装置;结构:1x2P;间距:3.81mm;颜色:绿色;安装方式:弯插;排数:1;每排PIN数:2;额定电流:8A;额定电压:300V;线规 - AWG:-;线规 - 平方毫米:-;工作温度:-40℃~+105℃;", Color=绿色, Current Rating=8A, JLCPCB Part Class="Extended Part", LCSC Part Name="无固定装置 1x2P 3.81mm 排数:1 每排P数:2", Manufacturer=KANGNEX(康奈克斯电气), ManufacturerPart=WJ15EDGRC-3.81-02P-14-00A, Operating Temperature=-40℃~+105℃, Voltage Rating (Max)=300V, AddInBom=yes, Connection Type=-, Connector Type=板端/插座-闭口, ConvertToPcb=yes, Datasheet=https://item.szlcsc.com/datasheet/WJ15EDGRC-3.81-02P-14-00A/8881.html, FootprintName=CONN-TH_2P-P3.81_WJ15EDGRC-3.81-2P, ModelId=816ec8aca6fe4785be70cb4c5121258d, ModelName=CONN-TH_2P_L8.5-W9.2-H7.0-P3.81, ModelTransform=334.645,360.2355,0,0,0,0,0,-118.11,-137.795, Mounting Type=弯插, Number of Pins=2P, Number of PINs Per Row=2, Number of Positions or Pins=1x2P, Number of Rows=1, Outlet Direction (Vertical Basis)=-, Pitch=3.81mm, Supplier=LCSC, Supplier Footprint=弯插,P=3.81mm, SupplierPart=C8387, Symbol=WJ15EDGRC-3.81-2P, Termination Style=无固定装置, Wire Gauge - AWG=-, Wire Gauge - mm2=-
R1: "电阻类型:厚膜电阻;阻值:866kΩ;精度:±1%;功率:62.5mW;工作电压:50V;温度系数:±100ppm/℃;", JLCPCB Part Class="Extended Part", LCSC Part Name="厚膜电阻 866kΩ ±1%", Manufacturer=UNI-ROYAL(厚声), ManufacturerPart=0402WGF8663TCE, Operating Temperature=-55℃~+155℃, Power(Watts)=62.5mW, Temperature Coefficient=±100ppm/℃, Tolerance=±1%, Voltage-Supply(Max)=50V, AddInBom=yes, ConvertToPcb=yes, Datasheet=https://item.szlcsc.com/datasheet/0402WGF8663TCE/27769.html, FootprintName=R0402, ModelId=98c88bc2b9094f218f3a3e30a7012738, ModelName=R0402_L1.0-W0.5-H0.4, ModelTransform=39.37,19.685,0,0,0,0,0,0,0, Supplier=LCSC, Supplier Footprint=0402, SupplierPart=C27020, Symbol=0402WGF8663TCE, Type=厚膜电阻
R2: "电阻类型:薄膜电阻;阻值:91kΩ;精度:±0.1%;功率:62.5mW;工作电压:50V;温度系数:±25ppm/℃;", JLCPCB Part Class="Extended Part", LCSC Part Name="薄膜电阻 91kΩ ±0.1% 62.5mW", Manufacturer=YAGEO(国巨), ManufacturerPart=RT0402BRD0791KL, Operating Temperature=-55℃~+155℃, Power(Watts)=62.5mW, Temperature Coefficient=±25ppm/℃, Tolerance=±0.1%, Voltage-Supply(Max)=50V, AddInBom=yes, ConvertToPcb=yes, Datasheet=https://item.szlcsc.com/datasheet/RT0402BRD0791KL/913274.html, FootprintName=R0402, ModelId=98c88bc2b9094f218f3a3e30a7012738, ModelName=R0402_L1.0-W0.5-H0.4, ModelTransform=39.37,19.685,0,0,0,0,0,0,0, Supplier=LCSC, Supplier Footprint=0402, SupplierPart=C852952, Symbol=RT0402BRD0791KL, Type=薄膜电阻
R3 R16 R34 R37 R38 R39 R41 R42 R43: "电阻类型:厚膜电阻;阻值:0Ω;精度:±1%;功率:62.5mW;工作电压:50V;温度系数:±400ppm/℃;", JLCPCB Part Class="Extended Part", LCSC Part Name="0Ω ±1% 62.5mW 厚膜电阻", Manufacturer=FOJAN(富捷), ManufacturerPart=FRC0402F0000TS, Operating Temperature=-55℃~+155℃, Power(Watts)=62.5mW, Temperature Coefficient=±400ppm/℃, Tolerance=±1%, Voltage-Supply(Max)=50V, AddInBom=yes, ConvertToPcb=yes, Datasheet=https://item.szlcsc.com/datasheet/FRC0402F0000TS/3180371.html, FootprintName=R0402, ModelId=98c88bc2b9094f218f3a3e30a7012738, ModelName=R0402_L1.0-W0.5-H0.4, ModelTransform=39.37,19.685,0,0,0,0,0,0,0, Supplier=LCSC, Supplier Footprint=0402, SupplierPart=C2906858, Symbol=FRC0402F0000TS, Type=厚膜电阻
R4 R28: "电阻类型:厚膜电阻;阻值:100kΩ;精度:±1%;功率:62.5mW;工作电压:50V;温度系数:±100ppm/℃;", JLCPCB Part Class="Extended Part", LCSC Part Name="100kΩ ±1% 62.5mW 厚膜电阻", Manufacturer=FOJAN(富捷), ManufacturerPart=FRC0402F1003TS, Operating Temperature=-55℃~+155℃, Power(Watts)=62.5mW, Temperature Coefficient=±100ppm/℃, Tolerance=±1%, Voltage-Supply(Max)=50V, AddInBom=yes, ConvertToPcb=yes, Datasheet=https://item.szlcsc.com/datasheet/FRC0402F1003TS/3180372.html, FootprintName=R0402, ModelId=98c88bc2b9094f218f3a3e30a7012738, ModelName=R0402_L1.0-W0.5-H0.4, ModelTransform=39.37,19.685,0,0,0,0,0,0,0, Supplier=LCSC, Supplier Footprint=0402, SupplierPart=C2906859, Symbol=FRC0402F1003TS, Type=厚膜电阻
R5 R6 R7 R8 R10 R11: "电阻类型:厚膜电阻;阻值:47Ω;精度:±1%;功率:50mW;最大工作电压:25V;温度系数:±200ppm/℃;", JLCPCB Part Class="Extended Part", LCSC Part Name="47Ω ±1% 50mW 厚膜电阻", Manufacturer=UNI-ROYAL(厚声), ManufacturerPart=0201WMF470JTEE, Operating Temperature Range=-55℃~+155℃, Overload Voltage (Max)=25V, Power(Watts)=50mW, Temperature Coefficient=±200ppm/℃, Tolerance=±1%, AddInBom=yes, ConvertToPcb=yes, Datasheet=https://atta.szlcsc.com/upload/public/pdf/source/20200306/C422600_1E6D84923E4A46A82E41ADD87F860B5C.pdf, FootprintName=R0201, ModelId=0e006ba4c37b4b73b0e85d5d1c6800cb, ModelName=R0201_L0.6-W0.3-H0.3, ModelTransform=23.622,11.811,0,0,0,0,0,-0.0005,0, Supplier=LCSC, Supplier Footprint=0201, SupplierPart=C620443, Symbol=0201WMF470JTEE, Type=厚膜电阻
R9 R27 R32 R33 R36 R40: "电阻类型:厚膜电阻;阻值:10kΩ;精度:±1%;功率:62.5mW;工作电压:50V;温度系数:±100ppm/℃;", JLCPCB Part Class="Extended Part", LCSC Part Name="10kΩ ±1% 62.5mW 厚膜电阻", Manufacturer=FOJAN(富捷), ManufacturerPart=FRC0402F1002TS, Operating Temperature=-55℃~+155℃, Power(Watts)=62.5mW, Temperature Coefficient=±100ppm/℃, Tolerance=±1%, Voltage-Supply(Max)=50V, AddInBom=yes, ConvertToPcb=yes, Datasheet=https://item.szlcsc.com/datasheet/FRC0402F1002TS/3180374.html, FootprintName=R0402, ModelId=98c88bc2b9094f218f3a3e30a7012738, ModelName=R0402_L1.0-W0.5-H0.4, ModelTransform=39.37,19.685,0,0,0,0,0,0,0, Supplier=LCSC, Supplier Footprint=0402, SupplierPart=C2906861, Symbol=FRC0402F1002TS, Type=厚膜电阻
R12 R13 R21 R24: "电阻类型:厚膜电阻;阻值:4.7kΩ;精度:±1%;功率:62.5mW;工作电压:50V;温度系数:±100ppm/℃;", JLCPCB Part Class="Extended Part", LCSC Part Name="厚膜电阻 4.7kΩ ±1% 62.5mW", Manufacturer=YAGEO(国巨), ManufacturerPart=RC0402FR-074K7L, Operating Temperature=-55℃~+155℃, Power(Watts)=62.5mW, Temperature Coefficient=±100ppm/℃, Tolerance=±1%, Voltage-Supply(Max)=50V, AddInBom=yes, ConvertToPcb=yes, Datasheet=https://item.szlcsc.com/datasheet/RC0402FR-074K7L/107086.html, FootprintName=R0402, ModelId=98c88bc2b9094f218f3a3e30a7012738, ModelName=R0402_L1.0-W0.5-H0.4, ModelTransform=39.37,19.685,0,0,0,0,0,0,0, Supplier=LCSC, Supplier Footprint=0402, SupplierPart=C105871, Symbol=RC0402FR-074K7L, Type=厚膜电阻
R14 R15 R17 R18: "电阻类型:厚膜电阻;阻值:100Ω;精度:±1%;功率:62.5mW;工作电压:50V;温度系数:±100ppm/℃;", JLCPCB Part Class="Extended Part", LCSC Part Name="100Ω ±1% 62.5mW 厚膜电阻", Manufacturer=FOJAN(富捷), ManufacturerPart=FRC0402F1000TS, Operating Temperature=-55℃~+155℃, Power(Watts)=62.5mW, Temperature Coefficient=±100ppm/℃, Tolerance=±1%, Voltage-Supply(Max)=50V, AddInBom=yes, ConvertToPcb=yes, Datasheet=https://item.szlcsc.com/datasheet/FRC0402F1000TS/3180373.html, FootprintName=R0402, ModelId=98c88bc2b9094f218f3a3e30a7012738, ModelName=R0402_L1.0-W0.5-H0.4, ModelTransform=39.37,19.685,0,0,0,0,0,0,0, Supplier=LCSC, Supplier Footprint=0402, SupplierPart=C2906860, Symbol=FRC0402F1000TS, Type=厚膜电阻
R19 R22: "电阻类型:厚膜电阻;阻值:470Ω;精度:±1%;功率:62.5mW;工作电压:50V;温度系数:±100ppm/℃;", JLCPCB Part Class="Basic Part", LCSC Part Name="厚膜电阻 470Ω ±1%", Manufacturer=UNI-ROYAL(厚声), ManufacturerPart=0402WGF4700TCE, Operating Temperature=-55℃~+155℃, Power(Watts)=62.5mW, Temperature Coefficient=±100ppm/℃, Tolerance=±1%, Voltage-Supply(Max)=50V, AddInBom=yes, ConvertToPcb=yes, Datasheet=https://item.szlcsc.com/datasheet/0402WGF4700TCE/25860.html, FootprintName=R0402, ModelId=98c88bc2b9094f218f3a3e30a7012738, ModelName=R0402_L1.0-W0.5-H0.4, ModelTransform=39.37,19.685,0,0,0,0,0,0,0, Supplier=LCSC, Supplier Footprint=0402, SupplierPart=C25117, Symbol=0402WGF4700TCE, Type=厚膜电阻
R20 R23: "电阻类型:厚膜电阻;阻值:1kΩ;精度:±5%;功率:62.5mW;工作电压:50V;温度系数:±100ppm/℃;", JLCPCB Part Class="Extended Part", LCSC Part Name="1kΩ ±5% 62.5mW 厚膜电阻", Manufacturer=FOJAN(富捷), ManufacturerPart="FRC0402J102 TS", Operating Temperature=-55℃~+155℃, Power(Watts)=62.5mW, Temperature Coefficient=±100ppm/℃, Tolerance=±5%, Voltage-Supply(Max)=50V, AddInBom=yes, ConvertToPcb=yes, Datasheet=https://item.szlcsc.com/datasheet/FRC0402J102%2520TS/3180412.html, FootprintName=R0402, ModelId=98c88bc2b9094f218f3a3e30a7012738, ModelName=R0402_L1.0-W0.5-H0.4, ModelTransform=39.37,19.685,0,0,0,0,0,0,0, Supplier=LCSC, Supplier Footprint=0402, SupplierPart=C2906899, Symbol="FRC0402J102 TS", Type=厚膜电阻
R25: "电阻类型:厚膜电阻;阻值:47kΩ;精度:±1%;功率:62.5mW;工作电压:50V;温度系数:±100ppm/℃;", JLCPCB Part Class="Basic Part", LCSC Part Name="厚膜电阻 47kΩ ±1%", Manufacturer=UNI-ROYAL(厚声), ManufacturerPart=0402WGF4702TCE, Operating Temperature=-55℃~+155℃, Power(Watts)=62.5mW, Temperature Coefficient=±100ppm/℃, Tolerance=±1%, Voltage-Supply(Max)=50V, AddInBom=yes, ConvertToPcb=yes, Datasheet=https://item.szlcsc.com/datasheet/0402WGF4702TCE/26535.html, FootprintName=R0402, ModelId=98c88bc2b9094f218f3a3e30a7012738, ModelName=R0402_L1.0-W0.5-H0.4, ModelTransform=39.37,19.685,0,0,0,0,0,0,0, Supplier=LCSC, Supplier Footprint=0402, SupplierPart=C25792, Symbol=0402WGF4702TCE, Type=厚膜电阻
R26 R29: "电阻类型:厚膜电阻;阻值:1.5kΩ;精度:±1%;功率:62.5mW;工作电压:50V;温度系数:±100ppm/℃;", JLCPCB Part Class="Extended Part", LCSC Part Name="1.5kΩ ±1% 62.5mW 厚膜电阻", Manufacturer=FOJAN(富捷), ManufacturerPart=FRC0402F1501TS, Operating Temperature=-55℃~+155℃, Power(Watts)=62.5mW, Temperature Coefficient=±100ppm/℃, Tolerance=±1%, Voltage-Supply(Max)=50V, AddInBom=yes, ConvertToPcb=yes, Datasheet=https://item.szlcsc.com/datasheet/FRC0402F1501TS/3279176.html, FootprintName=R0402, ModelId=98c88bc2b9094f218f3a3e30a7012738, ModelName=R0402_L1.0-W0.5-H0.4, ModelTransform=39.37,19.685,0,0,0,0,0,0,0, Supplier=LCSC, Supplier Footprint=0402, SupplierPart=C2933074, Symbol=FRC0402F1501TS, Type=厚膜电阻
R30: "电阻类型:厚膜电阻;阻值:590Ω;精度:±1%;功率:62.5mW;工作电压:50V;温度系数:±100ppm/℃;", JLCPCB Part Class="Extended Part", LCSC Part Name="590Ω ±1% 62.5mW 厚膜电阻", Manufacturer=FOJAN(富捷), ManufacturerPart=FRC0402F5900TS, Operating Temperature=-55℃~+155℃, Power(Watts)=62.5mW, Temperature Coefficient=±100ppm/℃, Tolerance=±1%, Voltage-Supply(Max)=50V, AddInBom=yes, ConvertToPcb=yes, Datasheet=https://item.szlcsc.com/datasheet/FRC0402F5900TS/3471539.html, FootprintName=R0402, ModelId=98c88bc2b9094f218f3a3e30a7012738, ModelName=R0402_L1.0-W0.5-H0.4, ModelTransform=39.37,19.685,0,0,0,0,0,0,0, Supplier=LCSC, Supplier Footprint=0402, SupplierPart=C2998181, Symbol=FRC0402F5900TS, Type=厚膜电阻
R31: "电阻类型:厚膜电阻;阻值:2kΩ;精度:±1%;功率:62.5mW;工作电压:50V;温度系数:±100ppm/℃;", JLCPCB Part Class="Extended Part", LCSC Part Name="2kΩ ±1% 62.5mW 厚膜电阻", Manufacturer=FOJAN(富捷), ManufacturerPart=FRC0402F2001TS, Operating Temperature=-55℃~+155℃, Power(Watts)=62.5mW, Temperature Coefficient=±100ppm/℃, Tolerance=±1%, Voltage-Supply(Max)=50V, AddInBom=yes, ConvertToPcb=yes, Datasheet=https://item.szlcsc.com/datasheet/FRC0402F2001TS/3186279.html, FootprintName=R0402, ModelId=98c88bc2b9094f218f3a3e30a7012738, ModelName=R0402_L1.0-W0.5-H0.4, ModelTransform=39.37,19.685,0,0,0,0,0,0,0, Supplier=LCSC, Supplier Footprint=0402, SupplierPart=C2909344, Symbol=FRC0402F2001TS, Type=厚膜电阻
R35: "电阻类型:厚膜电阻;阻值:34.8kΩ;精度:±1%;功率:62.5mW;工作电压:50V;温度系数:±100ppm/℃;", JLCPCB Part Class="Extended Part", LCSC Part Name="34.8kΩ ±1% 62.5mW 厚膜电阻", Manufacturer=FOJAN(富捷), ManufacturerPart=FRC0402F3482TS, Operating Temperature=-55℃~+155℃, Power(Watts)=62.5mW, Temperature Coefficient=±100ppm/℃, Tolerance=±1%, Voltage-Supply(Max)=50V, AddInBom=yes, ConvertToPcb=yes, Datasheet=https://item.szlcsc.com/datasheet/FRC0402F3482TS/3471450.html, FootprintName=R0402, ModelId=98c88bc2b9094f218f3a3e30a7012738, ModelName=R0402_L1.0-W0.5-H0.4, ModelTransform=39.37,19.685,0,0,0,0,0,0,0, Supplier=LCSC, Supplier Footprint=0402, SupplierPart=C2998092, Symbol=FRC0402F3482TS, Type=厚膜电阻
S1 S2 S3 S4: "模拟压力传感器", JLCPCB Part Class="Extended Part", Manufacturer Part=MAX40200AUK+T, Add into BOM=yes, Convert to PCB=yes, Datasheet=https://atta.szlcsc.com/upload/public/pdf/source/20210603/11AAC644196C350B02B9F99D47093F30.pdf, Supplier=LCSC, Supplier Footprint=SOT-23-5
SW1 SW2 SW3: "电路结构:单刀单掷;按钮形状:圆形按钮;作用力:1.6N;安装方式:立贴;开关长度:3.9mm;开关宽度:3mm;开关高度:2mm;带支架:不带支架;触点电流:50mA;额定电压:12V;带灯:-;工作寿命:10万次;", Actuator/Cap Color=黑色, Contact Current=50mA, IP Rating=-, JLCPCB Part Class="Basic Part", LCSC Part Name="3.9*3*2mm 立贴 轻触开关", Manufacturer=XUNPU(讯普), ManufacturerPart=TS-1088-AR02016, Operating Force=1.6N, Operating Temperature=-30℃~+80℃, Voltage Rating=12V, Actuator Style=圆形按钮, AddInBom=yes, Circuit=单刀单掷, ConvertToPcb=yes, Datasheet=https://item.szlcsc.com/datasheet/TS-1088-AR02016/763484.html, FootprintName=SW-SMD_L3.9-W3.0-P4.45, Length=3.9mm, Life=10万次, ModelId=b26698b69f274ffabef8a26c7d0e5dd1, ModelName=SW-SMD_L3.9-W2.9-H2.0-LS4.8, ModelTransform=188.976,114.174,0,0,0,0,0,0,0, Mounting Type=立贴, Supplier=LCSC, Supplier Footprint=SMD,4x3mm, SupplierPart=C720477, Switch Height=2mm, Symbol=TS-1088-AR02016, Termination Style=SMD接片, Width=3mm, with Bracket=不带支架, With Lamp=-
U1: "功能类型:升降压型;工作电压:1.6V~5.5V;输出电压:1.2V~5.3V;输出电流:2A;输出类型:可调;", Frequency - Switching=2.2MHz, JLCPCB Part Class="Extended Part", LCSC Part Name="升降压型 2A 1.6V~5.5V", Manufacturer=TI(德州仪器), ManufacturerPart=TPS631000DRLR, Operating Temperature=-40℃~+125℃, Output Current=2A, Output Voltage=1.2V~5.3V, Quiescent Current=8uA, Voltage - Supply=1.6V~5.5V, AddInBom=yes, ConvertToPcb=yes, Datasheet=https://www.ti.com/cn/lit/ds/symlink/tps631000.pdf, Features=轻载高效模式；过流保护；负载断开, FootprintName=SOT-583-8_L2.1-W1.2-P0.50-LS1.6-BL, Function=升降压型, ModelId=14eb3df1056d4df2aac7ceeb7e81e738, ModelName=SOT-583-8_L2.1-W1.2-P0.50-LS1.6-BL, ModelTransform=82.677,62.992,0,0,0,0,0,0,0, Number of Outputs=-, Output Type=可调, Supplier=LCSC, Supplier Footprint=SOT-583, SupplierPart=C5219190, Switch tube (built-in/external)=内置, Symbol=TPS631000DRLR, Synchronous Rectifier=-, Topology=降压-升压式
U2: "接口类型:SPI;存储容量:128Mbit;时钟频率(fc):133MHz;", Clock Frequency=133MHz, JLCPCB Part Class="Basic Part", LCSC Part Name="编带 支持双路/四路SPI接口的3V、128Mbit 串行闪存", Manufacturer=Winbond(华邦), ManufacturerPart=W25Q128JVSIQ, Operating Temperature=-40℃~+85℃, Standby Supply Current=1uA, Voltage - Supply=2.7V~3.6V, AddInBom=yes, Block Erase Time(tBE)=120ms@(32KB), ConvertToPcb=yes, Data Retention - TDR (Year)=20年, Datasheet=https://item.szlcsc.com/datasheet/W25Q128JVSIQ/98729.html, Features=硬件写保护；绝对写保护；写使能锁存；软件写保护；上电复位, FootprintName=SOIC-8_L5.3-W5.3-P1.27-LS8.0-BL, Interface=SPI, Memory Size=128Mbit, ModelId=f83d990ad74f400caf5ac920b7771508, ModelName=SOIC-8_L5.3-W5.3-H1.9-LS7.9-P1.27, ModelTransform=208.661,311.25654,0,0,0,0,-0.0005,0.0005,0, Page Programming Time (Tpp)=3ms, Program / Erase Cycles=100000次, Supplier=LCSC, Supplier Footprint=SOIC-8-208mil, SupplierPart=C97521, Symbol=W25Q128JVSIQTR, Write Cycle Time (tWC)=-
U3: "CPU内核:ARM Cortex-M0+;CPU最大主频:64MHz;CPU位数:32 Bit;", JLCPCB Part Class="Extended Part", LCSC Part Name="主流Arm Cortex-M0+ MCU，具有64 KB Flash存储器、8 KB RAM、64 MHz CPU、2x USART、定时器、ADC和通信接口，1.7-3.6V", Manufacturer=ST(意法半导体), ManufacturerPart=STM32G031C8T6, Operating Temperature=-40℃~+85℃, Voltage - Supply=1.7V~3.6V, ADC (Bit)=12bit, AddInBom=yes, ConvertToPcb=yes, Core Size="32 Bit", CPU Core="ARM Cortex-M0+", CPU Maximum Speed=64MHz, Datasheet=https://item.szlcsc.com/datasheet/STM32G031C8T6/428993.html, EEPROM=-, FootprintName=LQFP-48_L7.0-W7.0-P0.50-LS9.0-BL, ModelId=093be70396ff421eb2cdb946d5311efc, ModelName=LQFP-48_L7.0-W7.0-H1.4-LS9.0-P0.50, ModelTransform=354.331,354.331,0,0,0,0,0,0,0, Number of I/O=44, Oscillator Type=内置+外置, Program Memory Type=FLASH, Program Storage Size=64KB, RAM Size=8KB, Supplier=LCSC, Supplier Footprint=LQFP-48(7x7), SupplierPart=C432205, Symbol=STM32G031C8T6
U4: "输出极性:正极;工作电压:5.5V;输出电压:3V;输出电流:250mA;电源纹波抑制比(PSRR):82dB@(1kHz);输出类型:固定;", JLCPCB Part Class="Extended Part", LCSC Part Name="3V 250mA 5.5V", Manufacturer=TI(德州仪器), ManufacturerPart=LP5907MFX-3.0/NOPB, Operating Temperature=-40℃~+125℃@(Tj), Output Current=250mA, Output Voltage=3V, Power Supply Rejection Ratio (PSRR)=82dB@(1kHz), standby current=12uA, Voltage - Supply=5.5V, Voltage Dropout=120mV@(250mA), AddInBom=yes, ConvertToPcb=yes, Datasheet=https://www.ti.com/cn/lit/ds/symlink/lp5907.pdf, Features=热关断；使能控制；输出放电；短路保护, FootprintName=SOT-23-5_L3.0-W1.7-P0.95-LS2.8-BL, ModelId=0a2a1b8f50944f73965918ad6e5fe167, ModelName=SOT-23-5_L2.9-W1.6-H1.1-LS2.8-P0.95, ModelTransform=118.60433,114.173,0,90,0,0,0.0005,0.0005,0, Noise=6.5uVrms, Number of Outputs=1, Output Configuration=正极, Output Type=固定, Supplier=LCSC, Supplier Footprint=SOT-23-5, SupplierPart=C475492, Symbol=LP5907MFX-3.0/NOPB
U5: "输出极性:正极;工作电压:6V;输出电压:5V;输出电流:300mA;电源纹波抑制比(PSRR):65dB@(100Hz);输出类型:固定;", JLCPCB Part Class="Extended Part", LCSC Part Name="800mV~5.5V 300mA 6V", Manufacturer=TI(德州仪器), ManufacturerPart=TPS7A2050PDBVR, Operating Temperature=-40℃~+125℃@(Tj), Output Current=300mA, Output Voltage=5V, Power Supply Rejection Ratio (PSRR)=65dB@(100Hz), standby current=6.5uA, Voltage - Supply=6V, Voltage Dropout=140mV@(300mA), AddInBom=yes, ConvertToPcb=yes, Datasheet=https://www.ti.com/cn/lit/ds/symlink/tps7a20.pdf, Features=使能控制；输入欠压保护；内置软启动；短路保护；过流保护；输出放电；热关断, FootprintName=SOT-23-5_L2.9-W1.6-P0.95-LS2.8-BR, ModelId=7ba65df16e7b4570af156e925f9c37fe, ModelName=SOT-23-5_L2.9-W1.6-P0.95-LS2.8-BR, ModelTransform=114.173,114.173,0,90,0,0,0,0,0, Noise=10uVrms, Number of Outputs=1, Output Configuration=正极, Output Type=固定, Supplier=LCSC, Supplier Footprint=SOT-23-5, SupplierPart=C2864504, Symbol=TPS7A2050PDBVR
U6: "分辨率(位):16;采样率:250kHz;工作电压:2.3V~5.5V;接口类型:SPI;", Clock Frequency=-, JLCPCB Part Class="Extended Part", LCSC Part Name="16 位 4 通道 250 kSPS PulSAR ADC", Manufacturer=ADI(亚德诺), ManufacturerPart=AD7682BCPZ, Operating Temperature=-40℃~+85℃, Quiescent Current (Iq)=50nA, Voltage - Supply=2.3V~5.5V, Voltage Reference=内置, ADC architecture=SAR, AddInBom=yes, Clock/Oscillator=内置, ConvertToPcb=yes, Datasheet=https://item.szlcsc.com/datasheet/AD7682BCPZ/381170.html, differential input=是, DNL (LSB)=0.25LSB, Features=多路复用器；双极性输入；内置温度传感器, FootprintName=LFCSP-20_L4.0-W4.0-P0.50-BL-EP, Integral non - linearity=0.4LSB, Interface=SPI, ModelId=a3340110063d416e8a07a046bfa25306, ModelName=LFCSP-20_L4.0-W4.0-H1.0-P0.50, ModelTransform=157.48,157.48,0,90,0,0,-0.003,0.003,0, number of channels=4, Programmable Gain=-, Resolution (Bits)=16, Sampling Rate=250kHz, Signal-to-Noise Ratio=92.5dB, Supplier=LCSC, Supplier Footprint=LFCSP-20(4x4), SupplierPart=C398823, Symbol=AD7682BCPZ
U7: "温度范围:-40℃~+125℃;湿度范围:0%RH~100%RH;接口类型:I2C;湿度精度:±1.8%RH;", Current - Supply=400nA, Humidity Tolerance=±1.8%RH, JLCPCB Part Class="Extended Part", LCSC Part Name="3.000.466 3.000.466 ±1.8%（典型）/ 最大 ±2.5% RH 的数字式温湿度传感器", Manufacturer=Sensirion(瑞士盛思锐), ManufacturerPart=SHT41-AD1B-R2, Temperature Range=-40℃~+125℃, Temperature Tolerance=±0.2℃, Voltage - Supply=1.08V~3.6V, AddInBom=yes, ConvertToPcb=yes, Datasheet=https://item.szlcsc.com/datasheet/SHT41-AD1B-R2/8492053.html, Features=内置加热器；工厂校准, FootprintName=DFN-4_L1.5-W1.5-SHT41-AD1B-R2, Humidity=0%RH~100%RH, Interface=I2C, ModelId=d740bd0688d14669b1c87f9602af067d, ModelName=DFN-4_L1.5-W1.5-SHT41-AD1B-R2, ModelTransform=59.13374,59.055,0,0,0,0,0,0,0, Resolution=16bit, Supplier=LCSC, Supplier Footprint=DFN-4(1.5x1.5), SupplierPart=C7461861, Symbol=SHT41-AD1B-R2
U8 U13: "压力范围:26Kpa~1.26bar;接口类型:SPI；I2C;", JLCPCB Part Class="Extended Part", LCSC Part Name="MEMS纳米压力传感器:260 - 1260 hPa绝对数字输出气压计", Manufacturer=ST(意法半导体), ManufacturerPart=LPS22HBTR, Operating Temperature=-40℃~+85℃, standby current=1uA, Temperature Coefficient of Offset(TCO)=-, Voltage - Supply=1.7V~3.6V, Absolute Accuracy=0.1hpa, AddInBom=yes, ConvertToPcb=yes, Datasheet=https://item.szlcsc.com/datasheet/LPS22HBTR/95247.html, Features=片内温度补偿；集成ADC与数字接口；片内温度输出；片内校准与非易失存储；集成信号放大器, FootprintName=HLGA-10L_LPS22HBTR, Interface=SPI；I2C, ModelId=d5ee430d14324ccb82effb2dc42ae2a1, ModelName=HLGA-10L_L2.0-W2.0-H0.8-P0.5-LPS22HBTR, ModelTransform=78.74,78.74,0,0,0,0,0,0.195,0, Module=否, Pressure range=26Kpa~1.26bar, Relative Accuracy=0.1hpa, Response time=-, Supplier=LCSC, Supplier Footprint=HLGA-10(2x2), SupplierPart=C94049, Symbol=LPS22HBTR
U9: "连接器类型:电池底座;适用电池规格:CR1220;触头材质:-;触头镀层:金;工作温度:-40℃~+85℃;", JLCPCB Part Class="Extended Part", LCSC Part Name="电池座CR1220贴片式镀金 电池底座配套电池型号：CR1220-3V", Manufacturer=LX(连欣科技), ManufacturerPart=XDCR-1220-006, Operating Temperature=-40℃~+85℃, AddInBom=yes, Battery Type=CR1220, Connector Type=电池底座, Contact Material=-, Contact Plating=金, ConvertToPcb=yes, Datasheet=https://item.szlcsc.com/datasheet/XDCR-1220-006/8568589.html, FootprintName=BAT-SMD_CR1220-2ZX, ModelId=aa69efc108b9406287881e5b236f6e7a, ModelName=BAT-SMD_CR1220-2, ModelTransform=777.81069,586.46209,0,180,0,0,-19.685,0,-31.496, Supplier=LCSC, Supplier Footprint=SMD, SupplierPart=C7498147, Symbol=XDCR-1220-006